# Altium PCB USB-C (Female)_FFC-v1.0.0.PcbDoc
Units mm, origin at the board's own origin, x right, y up, seen from the top; angles counter-clockwise.
Board outline 18 x 16 mm, 2 copper layers (Top Layer, Bottom Layer), stack 1.57 mm thick; 6 components, 15 nets, 53 pads, 37 vias.
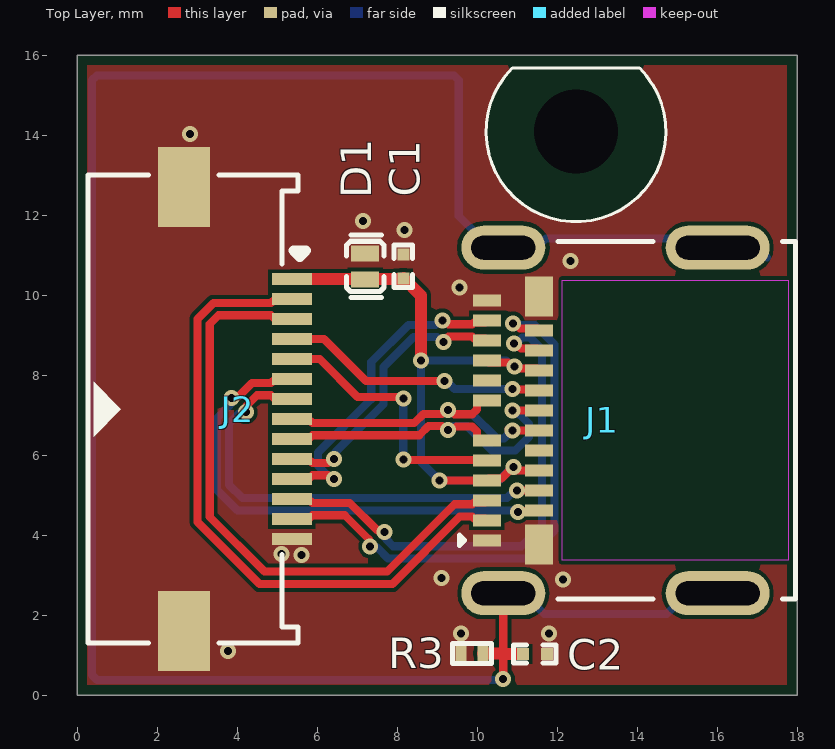
[diagram p0: Top Layer view]
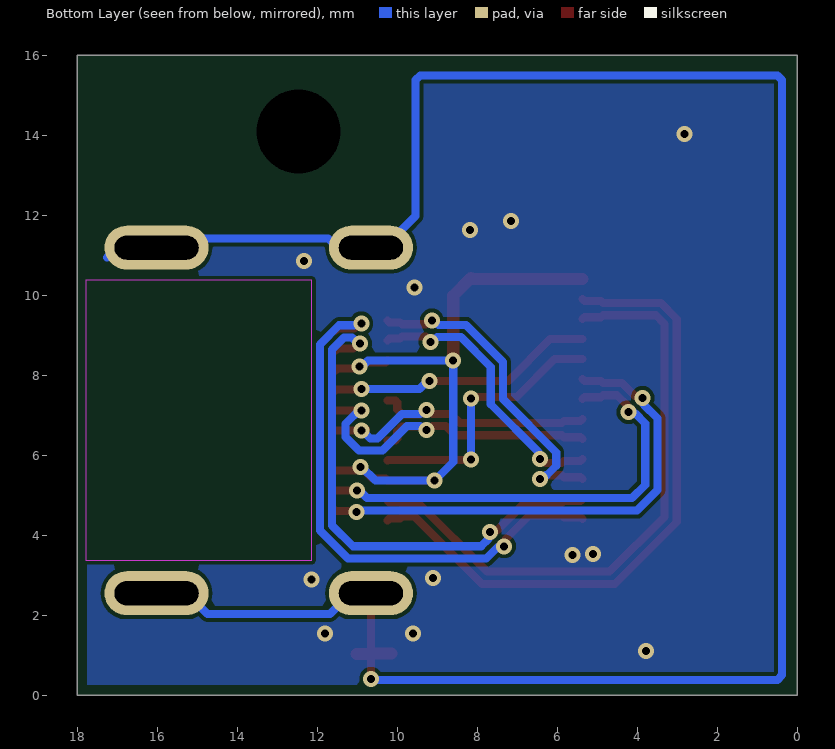
[diagram p1: Bottom Layer view, seen from below]
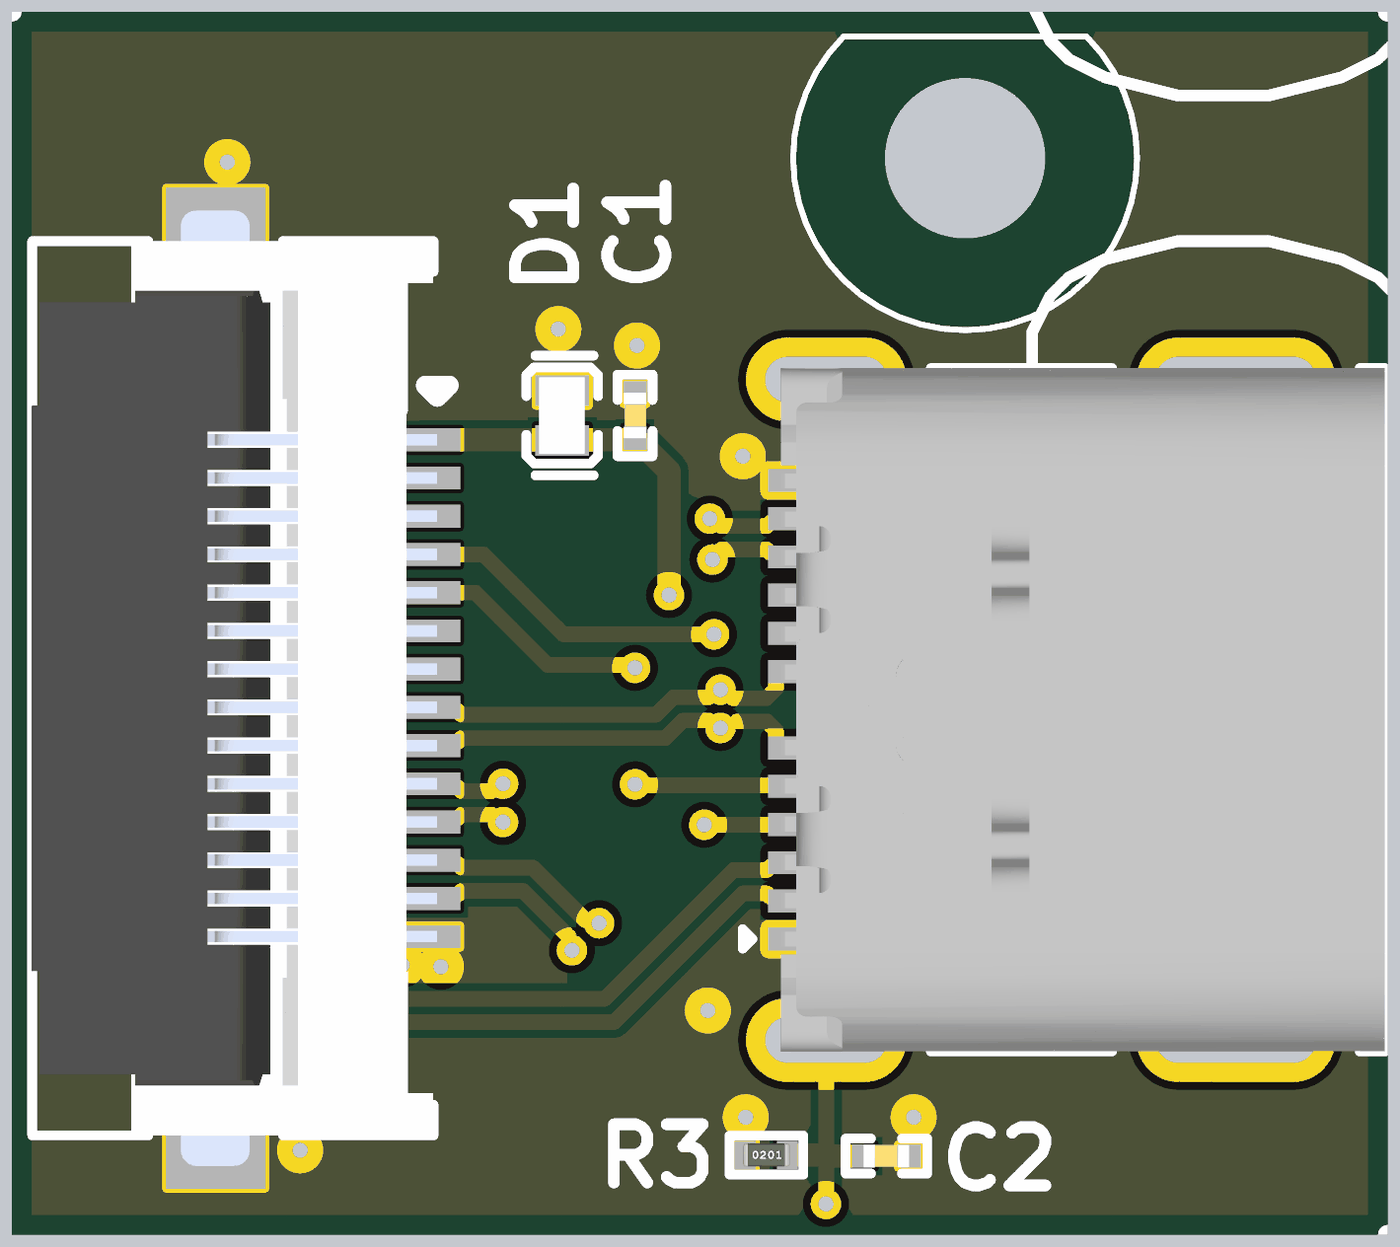
[diagram p2: 3D render of the assembled board from above, using the file's embedded part models]

## Layer stack, top to bottom
Top Solder: solder mask 0.0102, Solder Resist, Dk 4.8
Top Layer: signal copper 0.035
Dielectric 1: dielectric 1.5, FR-4, Dk 4.8
Bottom Layer: signal copper 0.035
Bottom Solder: solder mask 0.0102, Solder Resist, Dk 4.8

## Board outline
0,0 0,16 18,16 18,0

## Design rules (kind name [scope] priority, off if disabled: settings)
BoardOutlineClearance [All] p1: gap=0 ignorepadtopadclearanceinfootprint=FALSE except(0.254: Poly-OutlineEdge)
Clearance [All] p1: gap=0.102 ignorepadtopadclearanceinfootprint=TRUE
DiffPairsRouting [InDifferentialPairClass('USB')] p1: maxlimit=0.102 minlimit=0.102 mostfreqgap=0.102 toplayer_minwidth=0.203 toplayer_maxwidth=0.203 toplayer_prefwidth=0.203 bottomlayer_minwidth=0.203 bottomlayer_maxwidth=0.203 bottomlayer_prefwidth=0.203 impedanceprofiledriven=TRUE impedanceprofileid={FBA3005B-C4F6-4E0F-A7E3-7C070FF5C2AD} impedanceprofilevalue=90.000000 maxuncoupledlength=12.7
MinimumSolderMaskSliver [All] p1: minsoldermaskwidth=0.051
PolygonConnect [All] p1: connectstyle=Direct reliefconductorwidth=0.254 reliefentries=4 polygonreliefangle="90 Angle" airgapwidth=0.254
RoutingVias [All] p1: holewidth=0.2 width=0.4 viastyle="Through Hole" minholewidth=0.2 minwidth=0.4 maxholewidth=0.2 maxwidth=0.4
SilkToSilkClearance [All] p1: silktosilkclearance=0.051
SilkToSolderMaskClearance [IsPad] p1: minsilkscreentomaskgap=0.051 clearancetoexposedcopper=TRUE
SolderMaskExpansion [All] p1: expansion=0.102 istentingtop=FALSE
Width [All] p1: maxlimit=0.305 minlimit=0.102 preferedwidth=0.254 minimp=50.000000 maximp=50.000000 favimp=50.000000
26 further rules are at their usual default settings.

## Classes and differential pairs
differential pair class USB: TYPEC TYPEC_RX1 TYPEC_RX2 TYPECTX1 TYPECTX2
differential pair TYPECTX2: +TYPECTX2_P -TYPECTX2_N
differential pair TYPECTX1: +TYPECTX1_P -TYPECTX1_N
differential pair TYPEC: +TYPEC_P -TYPEC_N
differential pair TYPEC_RX2: +TYPEC_RX2_P -TYPEC_RX2_N
differential pair TYPEC_RX1: +TYPEC_RX1_P -TYPEC_RX1_N

## Components (designator, comment, footprint, x,y, rotation, side; value= is the part's Value field where it differs from the comment)
C1 "0.1uF" CAP-0201 8.153,10.719 r90 top
C2 "DNP" CAP-0201 11.443,1.029 r180 top value=4.7nF
D1 "DNP" "DFN1006-2L (Bi-Directional)" 7.201,10.719 r90 top
J1 "10152803-00011LF" 10152803-00011LF 16.014,6.868 r90 top locked
J2 "5051101492" 5051101492 4.017,7.15 r270 top locked
R3 "DNP" Res-0201 9.872,1.041 r0 top value=1MR

## Footprints (in the part's own frame and the unit in brackets; to place one, negate y for a bottom-side part, rotate by r counter-clockwise, add the part's x,y. Pads: shape width x height; smd on the part's side, far side on the other; paste and mask are expansions set on the pad)
10152803-00011LF [mm]
  rect 0.3x0.7 smd: A1(-3,5.77) A2(-2.5,5.77) A3(-2,5.77) A4(-1.5,5.77) A5(-1,5.77) A6(-0.5,5.77) A7(0.5,5.77) A8(1,5.77) A9(1.5,5.77) A10(2,5.77) A11(2.5,5.77) A12(3,5.77) B2(2.25,4.47) B3(1.75,4.47) B4(1.25,4.47) B5(0.75,4.47) B6(0.25,4.47) B7(-0.25,4.47) B8(-0.75,4.47) B9(-1.25,4.47) B10(-1.75,4.47) B11(-2.25,4.47)
  rect 1x0.7 smd: B1(3.1,4.47) B12(-3.1,4.47)
  oval 1.1x2.6 hole 0.6 slot 2.1 at 90 deg: S1(-4.32,0) S2(4.32,0)
  oval 1.1x2.1 hole 0.6 slot 1.6 at 90 deg: S3(-4.32,5.36) S4(4.32,5.36)
  Keep-Out Layer region: 3.5,-1.77 -3.5,-1.77 -3.5,3.88 3.5,3.88
  silkscreen extent -4.47,-1.95 4.47,6.45, body extent -4.47,-1.95 4.47,5.95, height 3.18
5051101492 [mm]
  rect 0.3x1 smd paste+0 mask+0.05: 1(-3.25,1.35) 2(-2.75,1.35) 3(-2.25,1.35) 4(-1.75,1.35) 5(-1.25,1.35) 6(-0.75,1.35) 7(-0.25,1.35) 8(0.25,1.35) 9(0.75,1.35) 10(1.25,1.35) 11(1.75,1.35) 12(2.25,1.35) 13(2.75,1.35) 14(3.25,1.35)
  rect 2x1.3 smd paste+0 mask+0.05: S1(-5.55,-1.35) S2(5.55,-1.35)
  silkscreen extent -5.85,-3.75 5.85,1.7, body extent -6.25,-3.76 6.25,1.54, height 1.9
CAP-0201 [mm]
  rect 0.3x0.3 smd mask+0.055: 1(-0.3,0) 2(0.3,0)
  silkscreen extent -0.53,-0.23 0.53,0.23, body extent -0.3,-0.15 0.3,0.15, height 0.28
"DFN1006-2L (Bi-Directional)" [mm]
  rect 0.4x0.7 smd paste+0 mask+0.051: 1(-0.325,0) 2(0.325,0)
  silkscreen extent -0.78,-0.47 0.78,0.47, body extent -0.5,-0.3 0.5,0.3, height 0.47
Res-0201 [mm]
  rect 0.27x0.37 smd mask+0.055: 1(-0.275,0) 2(0.275,0)
  silkscreen extent -0.48,-0.25 0.48,0.25, body extent -0.3,-0.15 0.3,0.15, height 0.29

## Part data
C1: library part GRM033R61E104ME14D, "CAP CER 0.1UF 25V X5R 0201", LCSC Part Number=C2649557, Manufacturer=Murata, Voltage Rating (DC)=25V, ComponentLink1Description=https://datasheet.octopart.com/GRM033R61E104ME14D-Murata-datasheet-96224008.pdf?src-supplier=Future+Electronics, ComponentLink1URL=https://datasheet.octopart.com/GRM033R61E104ME14D-Murata-datasheet-96224008.pdf?src-supplier=Future+Electronics, ComponentLink2Description=http://search.murata.co.jp/Ceramy/image/img/A01X/G101/ENG/GRM033R61E104ME14-01.pdf?src-supplier=Digikey, ComponentLink2URL=http://search.murata.co.jp/Ceramy/image/img/A01X/G101/ENG/GRM033R61E104ME14-01.pdf?src-supplier=Digikey, ComponentLink3Description=http://psearch.en.murata.com/capacitor/product/GRM033R61E104ME14%23.pdf?src-supplier=Avnet, ComponentLink3URL=http://psearch.en.murata.com/capacitor/product/GRM033R61E104ME14%23.pdf?src-supplier=Avnet, Height=330um, Item Type=Capacitors, Manufacturer Part Number=GRM033R61E104ME14D, Material=4241ConductorMaterial, Pricing="15000=0.0037, 45000=0.0036, 75000=0.0035, 300000=0.0034, 450000=0.0033 (USD)", RoHS=Yes, Stock=270000, Supplier="Future Electronics"
C2: library part GRM033R61E472MA12D, "CAP CER 4700PF 25V X5R 0201", Case Code (Imperial)=0201, Case Code (Metric)=0603, Dielectric=X5R, Manufacturer=Murata, Max Operating Temperature=85°C, Min Operating Temperature=-55°C, Package Quantity=15000, Supplier Part Number=81-GRM33R61E472MA12D, Tolerance=20%, Voltage Rating=25V, Case/Package=0201, ComponentLink1Description=http://www.mouser.com/ds/2/281/c02e-2905.pdf?src-supplier=Mouser, ComponentLink1URL=http://www.mouser.com/ds/2/281/c02e-2905.pdf?src-supplier=Mouser, ComponentLink2Description=http://search.murata.co.jp/Ceramy/image/img/A01X/G101/ENG/GRM033R61E472MA12-01.pdf?src-supplier=Digikey, ComponentLink2URL=http://search.murata.co.jp/Ceramy/image/img/A01X/G101/ENG/GRM033R61E472MA12-01.pdf?src-supplier=Digikey, ComponentLink3Description=https://search.murata.co.jp/Ceramy/image/img/A01X/G101/ENG/GRM033R61E472MA12-01.pdf?src-supplier=Digikey, ComponentLink3URL=https://search.murata.co.jp/Ceramy/image/img/A01X/G101/ENG/GRM033R61E472MA12-01.pdf?src-supplier=Digikey, Height=0.3mm, Item Type=Capacitors, Length=0.024inch, Manufacturer Part Number=GRM033R61E472MA12D, Material=4241ConductorMaterial, Mounting Technology="Surface Mount", Packaging="Tape and Reel", Pricing="1=0.1, 10=0.008, 50=0.008, 100=0.005, 1000=0.004, 10000=0.004 (USD)", RoHS=Yes, RoHS Compliant=Yes, Series=GRM, Stock=77158, Supplier=Mouser, Termination=SMD/SMT, Thickness=0.013inch, Voltage Rating (DC)=25V, Weight=1.2E-05oz, Width=0.012inch
D1: library part ESD5451N, "DFN1006-2(0402) ESD Protection Devices ROHS", LCSC Part Number=C2936977, Manufacturer="TECH PUBLIC", ComponentLink1Description=LCSC, ComponentLink1URL=https://www.lcsc.com/product-detail/span-style-background-color-ff0-ESD-span-Protection-Devices_TECH-PUBLIC-ESD5451N_C2936977.html, Manufacturer Part Number=ESD5451N
J1: "USB 3.2 TYPE C GEN 2 RECEPTACLE", LCSC Part Number=C5410523, Manufacturer="Amphenol Communications Solutions", Supplier Part Number=609-10152803-00011LFCT-ND, Category=Connectors, Item Type=Connector, Manufacturer Part Number=10152803-00011LF, Pricing="1=1.08, 10=0.914, 25=0.8568, 50=0.8156, 100=0.7767, 250=0.728 (USD)", RoHS=No, Stock=452, Supplier=Digikey
J2: "14 Position FFC, FPC Connector Contacts, Bottom 0.020\" (0.50mm) Surface Mount, Right Angle", LCSC Part Number=C3169593, Manufacturer=Molex, Manufacturer Part Number=505110-1492, Category="FFC / FPC", ComponentLink1Description=http://www.alliedelec.com/m/d/498d8ef60ec1840486550b3bb04c7a47.pdf?src-supplier=Allied+Electronics, ComponentLink1URL=http://www.alliedelec.com/m/d/498d8ef60ec1840486550b3bb04c7a47.pdf?src-supplier=Allied+Electronics, ComponentLink2Description=https://media.digikey.com/pdf/Data%20Sheets/Molex%20PDFs/FFC-FPC_Connectors.pdf?src-supplier=Digikey, ComponentLink2URL=https://media.digikey.com/pdf/Data%20Sheets/Molex%20PDFs/FFC-FPC_Connectors.pdf?src-supplier=Digikey, ComponentLink3Description=https://datasheet.octopart.com/505110-1492-Molex-datasheet-77521073.pdf?src-supplier=Element14, ComponentLink3URL=https://datasheet.octopart.com/505110-1492-Molex-datasheet-77521073.pdf?src-supplier=Element14, ComponentLink4Description=http://www.farnell.com/datasheets/2014276.pdf?src-supplier=Element14, ComponentLink4URL=http://www.farnell.com/datasheets/2014276.pdf?src-supplier=Element14, ComponentLink5Description=https://www.molex.com/datasheets/rohspdf/5051101492_rohs.pdf?src-supplier=Digikey, ComponentLink5URL=https://www.molex.com/datasheets/rohspdf/5051101492_rohs.pdf?src-supplier=Digikey, ComponentLink6Description=https://datasheet.octopart.com/505110-1492-Molex-datasheet-62088043.pdf?src-supplier=Farnell, ComponentLink6URL=https://datasheet.octopart.com/505110-1492-Molex-datasheet-62088043.pdf?src-supplier=Farnell, ComponentLink7Description=https://datasheet.octopart.com/505110-1492-Molex-datasheet-134576216.pdf?src-supplier=TME, ComponentLink7URL=https://datasheet.octopart.com/505110-1492-Molex-datasheet-134576216.pdf?src-supplier=TME, ComponentLink8Description=https://datasheet.octopart.com/505110-1492-Molex-datasheet-154754609.pdf?src-supplier=Master+Electronics, ComponentLink8URL=https://datasheet.octopart.com/505110-1492-Molex-datasheet-154754609.pdf?src-supplier=Master+Electronics, Item Type=Connector, Pricing="9000=0.3633, 15000=0.3615 (USD)", RoHS=Yes, Stock=9000, Supplier="Arrow Electronics", Supplier Part Number=505110-1492
R3: library part RC0201FR-071ML, "RES 1M OHM 1% 1/20W 0201", Case Code (Imperial)=0201, Case Code (Metric)=0603, LCSC Part Number=C295786, Manufacturer=Yageo, Max Operating Temperature=125°C, Max Power Dissipation=50mW, Min Operating Temperature=-55°C, Package Quantity=10000, Resistance Tolerance=1%, Resistor Type="Thick Film", Temperature Coefficient=200ppm/°C, Voltage Rating=25V, Case/Package=0201, ComponentLink1Description=https://datasheet.ciiva.com/29721/pyu-r-int-thick-7-29721005.pdf?src-supplier=Digikey, ComponentLink1URL=https://datasheet.ciiva.com/29721/pyu-r-int-thick-7-29721005.pdf?src-supplier=Digikey, ComponentLink2Description=https://datasheet.ciiva.com/29721/pyu-r-int-thick-7-29721006.pdf?src-supplier=Digikey, ComponentLink2URL=https://datasheet.ciiva.com/29721/pyu-r-int-thick-7-29721006.pdf?src-supplier=Digikey, ComponentLink3Description=https://datasheet.ciiva.com/7672/1563626-7672207.pdf?src-supplier=Element14, ComponentLink3URL=https://datasheet.ciiva.com/7672/1563626-7672207.pdf?src-supplier=Element14, ComponentLink4Description=https://datasheet.ciiva.com/22698/1563626-22698507.pdf?src-supplier=Element14, ComponentLink4URL=https://datasheet.ciiva.com/22698/1563626-22698507.pdf?src-supplier=Element14, ComponentLink5Description=https://datasheet.ciiva.com/25647/pyu-r-int-thick-7-25647311.pdf?src-supplier=Digikey, ComponentLink5URL=https://datasheet.ciiva.com/25647/pyu-r-int-thick-7-25647311.pdf?src-supplier=Digikey, Construction=Rectangular, Contact Plating=Tin,Matte, Depth=0.3mm, Features="Moisture Resistant", Height=0.01inch, Item Type=Resistor, Lead Free=5697LeadFree, Length=0.6mm, Manufacturer Part Number=RC0201FR-071ML, Military Standard=Not, Number of Terminations=2, Packaging="Tape and Reel", Power Rating=50mW, Pricing="1=0.104, 25=0.016, 100=0.008, 250=0.007, 1000=0.006 (USD)", Reach SVHC Compliant=Unknown, RoHS=Yes, RoHS Compliant=Yes, Series=RC, Stock=13025, Supplier=Avnet, Termination=SMD/SMT, Tolerance=1%, Voltage Rating (DC)=25V, Width=0.3mm

## Free pads (board coordinates)
  round 0.508 hole 2.1 unplated: MH(12.471,14.084)

## Via types
v1: diameter 0.4, hole 0.2, Top Layer to Bottom Layer, 37 vias

## Nets (pads, with @x,y where several pads share a name; then routed paths per layer and width w, separated by ;. In a path a pad name is that pad's centre, name@x,y a point inside that pad or via, vN(x,y) a via of type N, cw(c..) or ccw(c..) an arc to the next point about the centre after c; other vN are vias at no path point)
GND: C1.2 C2.1 D1.2 J1.A1 J1.A12 J1.B1 J1.B12 J2.14 J2.S1 J2.S2 R3.1
  other v1: 3.772,1.105 9.601,1.537 11.798,1.537 12.141,2.896 9.106,2.934 5.613,3.505 5.105,3.531 9.563,10.185 12.332,10.858 8.179,11.633 7.15,11.849 2.819,14.034
NetC2_2: C2.2 J1.S1 J1.S2 J1.S3 J1.S4 R3.2 | length 56.2
  Top Layer w0.203: v1(10.651,0.403) 10.654,0.406 10.654,1.041 J1.S3
  Top Layer w0.305: R3.2 10.654,1.041 10.654,1.029 C2.2@11.011,1.029
  Bottom Layer w0.203: J1.S3@10.604,2.498 J1.S3 11.346,2.548 11.346,2.357 11.354,2.357 11.679,2.032 14.74,2.032 15.256,2.548 J1.S1 J1.S1@17.007,2.548 ; v1(10.651,0.403) 10.629,0.381 0.495,0.381 0.376,0.5 0.376,15.374 0.495,15.493 9.421,15.493 9.54,15.374 9.54,11.98 10.333,11.188 J1.S4 10.826,11.36 11.664,11.36 11.722,11.417 14.792,11.417 15.022,11.188 17.007,11.188 J1.S2@17.251,10.944
TYPEC_CC1: J1.A5 J2.5 | length 6.8
  Top Layer w0.203: J2.5 6.065,8.4 7.01,7.455 8.115,7.455 v1(8.153,7.417) ; v1(8.153,5.893) 8.166,5.88 10.232,5.88 J1.A5
  Bottom Layer w0.203: v1(8.153,5.893) v1(8.153,7.417)
TYPEC_CC2: J1.B5 J2.4 | length 6.7
  Top Layer w0.203: J2.4 6.175,8.9 7.22,7.855 v1(9.186,7.855) ; v1(10.89,7.656) 10.909,7.637 11.525,7.637 J1.B5
  Bottom Layer w0.203: v1(9.186,7.855) 9.24,7.855 9.439,7.656 v1(10.89,7.656)
TYPEC_N: J1.A7 J1.B7 J2.8 | length 7.7
  Top Layer w0.203: J2.8 5.415,6.852 5.835,6.852 5.884,6.802 8.428,6.802 8.658,7.033 v1@9.119,7.033 ; v1@9.435,7.02 9.877,7.02 9.996,7.14 9.996,7.32 10.044,7.368 J1.A7 ; v1@10.783,6.655 10.852,6.655 v1(10.89,6.617) ; v1(10.89,6.617) J1.B7@11.544,6.618
  Bottom Layer w0.203: v1(9.271,7.131) 9.324,7.131 9.423,7.033 9.876,7.033 10.492,6.416 10.672,6.416 10.873,6.617 v1(10.89,6.617)
TYPEC_P: J1.A6 J1.B6 J2.9 | length 8.9
  Top Layer w0.203: J2.9 5.415,6.448 5.835,6.448 5.884,6.498 8.554,6.498 8.784,6.728 v1@9.119,6.728 ; 9.488,6.716 9.877,6.716 9.996,6.597 9.996,6.416 10.044,6.368 J1.A6 ; v1(10.89,7.119) J1.B6@11.544,7.118
  Bottom Layer w0.203: v1(9.271,6.629) 9.324,6.629 9.423,6.728 9.749,6.728 10.366,6.111 10.954,6.111 11.293,6.45 11.293,6.784 11.057,7.02 11.041,7.02 10.943,7.119 v1(10.89,7.119)
TYPEC_RX1_N: J1.B10 J2.7 | length 11.3
  Top Layer w0.203: v1@4.254,7.251 4.501,7.498 4.85,7.498 4.899,7.448 5.319,7.448 J2.7 ; v1(10.999,5.119) J1.B10
  Bottom Layer w0.203: v1(4.216,7.074) 4.179,7.036 4.04,7.036 3.798,6.794 3.798,5.257 4.132,4.924 10.75,4.924 10.945,5.119 v1(10.999,5.119)
TYPEC_RX1_P: J1.B11 J2.6 | length 12.3
  Top Layer w0.203: v1@4.039,7.466 4.375,7.802 4.85,7.802 4.899,7.852 5.319,7.852 J2.6 ; v1(11.02,4.584) 11.037,4.601 11.527,4.601 J1.B11
  Bottom Layer w0.203: v1(3.862,7.429) 3.824,7.391 3.824,7.252 3.493,6.921 3.493,5.131 4.005,4.619 10.985,4.619 v1(11.02,4.584)
TYPEC_RX2_N: J1.A10 J2.10 | length 6.6
  Top Layer w0.203: J2.10 5.415,5.852 5.835,5.852 5.884,5.802 v1@6.275,5.802 ; v1@9.283,8.966 9.877,8.966 9.926,8.916 10.196,8.916 J1.A10
  Bottom Layer w0.203: v1(6.426,5.901) 6.464,5.938 6.464,6.078 7.658,7.272 7.658,8.199 8.408,8.949 8.997,8.949 9.112,8.833 v1(9.166,8.833)
TYPEC_RX2_P: J1.A11 J2.11 | length 7.8
  Top Layer w0.203: J2.11 5.415,5.448 5.835,5.448 5.884,5.498 v1@6.275,5.498 ; v1@9.283,9.27 9.877,9.27 9.926,9.32 10.196,9.32 J1.A11
  Bottom Layer w0.203: v1(6.426,5.399) 6.373,5.399 6.275,5.498 6.259,5.498 6.023,5.734 6.023,6.068 7.353,7.398 7.353,8.325 8.281,9.253 8.962,9.253 9.078,9.369 v1(9.131,9.369)
TYPECTX1_N: J1.A3 J2.3 | length 15.2
  Top Layer w0.203: J2.3 5.319,9.448 4.899,9.448 4.85,9.498 3.531,9.498 3.315,9.281 3.315,4.458 4.686,3.086 7.754,3.086 9.439,4.77 9.877,4.77 9.926,4.82 10.196,4.82 J1.A3
TYPECTX1_P: J1.A2 J2.2 | length 16.3
  Top Layer w0.203: J2.2 5.319,9.852 4.899,9.852 4.85,9.802 3.405,9.802 3.01,9.407 3.01,4.331 4.56,2.781 7.88,2.781 9.565,4.466 9.877,4.466 9.926,4.416 10.196,4.416 J1.A2
TYPECTX2_N: J1.B2 J2.13 | length 13.6
  Top Layer w0.203: J2.13 5.415,4.448 5.835,4.448 5.884,4.498 6.691,4.498 v1@7.29,3.898 ; 11.072,9.166 11.496,9.166 J1.B2
  Bottom Layer w0.203: v1(7.328,3.721) 7.366,3.683 7.505,3.683 7.772,3.416 11.232,3.416 11.931,4.116 11.931,8.767 11.451,9.246 11.078,9.246 11.073,9.252 10.934,9.252 v1(10.896,9.289)
TYPECTX2_P: J1.B3 J2.12 | length 12.8
  Top Layer w0.203: J2.12 5.415,4.852 5.835,4.852 5.884,4.802 6.817,4.802 v1@7.506,4.113 ; v1(10.922,8.788) 10.975,8.788 11.097,8.666 11.496,8.666 J1.B3
  Bottom Layer w0.203: v1(7.683,4.076) 7.72,4.038 7.72,3.899 7.898,3.721 11.106,3.721 11.626,4.242 11.626,8.64 11.325,8.942 11.128,8.942 10.975,8.788 v1(10.922,8.788)
VBUS: C1.1 D1.1 J1.A4 J1.A9 J1.B4 J1.B9 J2.1 | length 16.4
  Top Layer w0.203: v1(9.059,5.364) 10.24,5.364 J1.A4 10.293,5.416 10.611,5.416 10.812,5.618 J1.B9 ; J1.A9 10.293,8.32 v1@10.779,8.32 ; v1(10.935,8.217) 10.988,8.217 11.038,8.166 11.496,8.166 J1.B4
  Top Layer w0.305: J2.1 8.122,10.4 8.153,10.432 8.598,9.987 v1(8.598,8.369)
  Bottom Layer w0.203: v1(10.913,5.708) 10.888,5.708 10.543,5.364 v1(9.059,5.364) 8.598,5.825 v1(8.598,8.369) 10.729,8.369 10.881,8.217 v1(10.935,8.217)
pads on no net: J1.A8 J1.B8

## Polygon pours and split planes (outlines as drawn)
GND on Top Layer "GND_L01_P001" (solid, remove dead copper, pour order 1): 0,0 0,16 18,16 18,0
GND on Bottom Layer "GND_L02_P002" (solid, remove dead copper, pour order 2): 0,0 0,16 18,16 18,0

## Other copper
Multi-Layer:
  pour cut-out: 10.88,15.675 ccw(c12.471,14.084) 14.062,15.675

## Silkscreen, mask and mechanical layers (free items; w line width, h text height)
Top Overlay:
  lines w0.076: 10.88,15.675 ccw(c12.471,14.084) 14.062,15.675 10.88,15.675
Board Outline:
  the board outline again, w0.127

## Dimensions
18,16 to 18,0 on Top Overlay
0,16 to 18,16 on Top Overlay